# Altium PCB OmniCore_SDR.PcbDoc (part 7 of 14)
Units mil, origin at the board's own origin, x right, y up, seen from the top; angles counter-clockwise.
Board outline 4724.72 x 2755.91 mil, 8 copper layers (Top, GND 1, Layer 1, Layer 2, GND 2, Layer 3, Power, Bottom), stack 40.468 mil thick; 534 components, 427 nets, 2325 pads, 1892 vias.
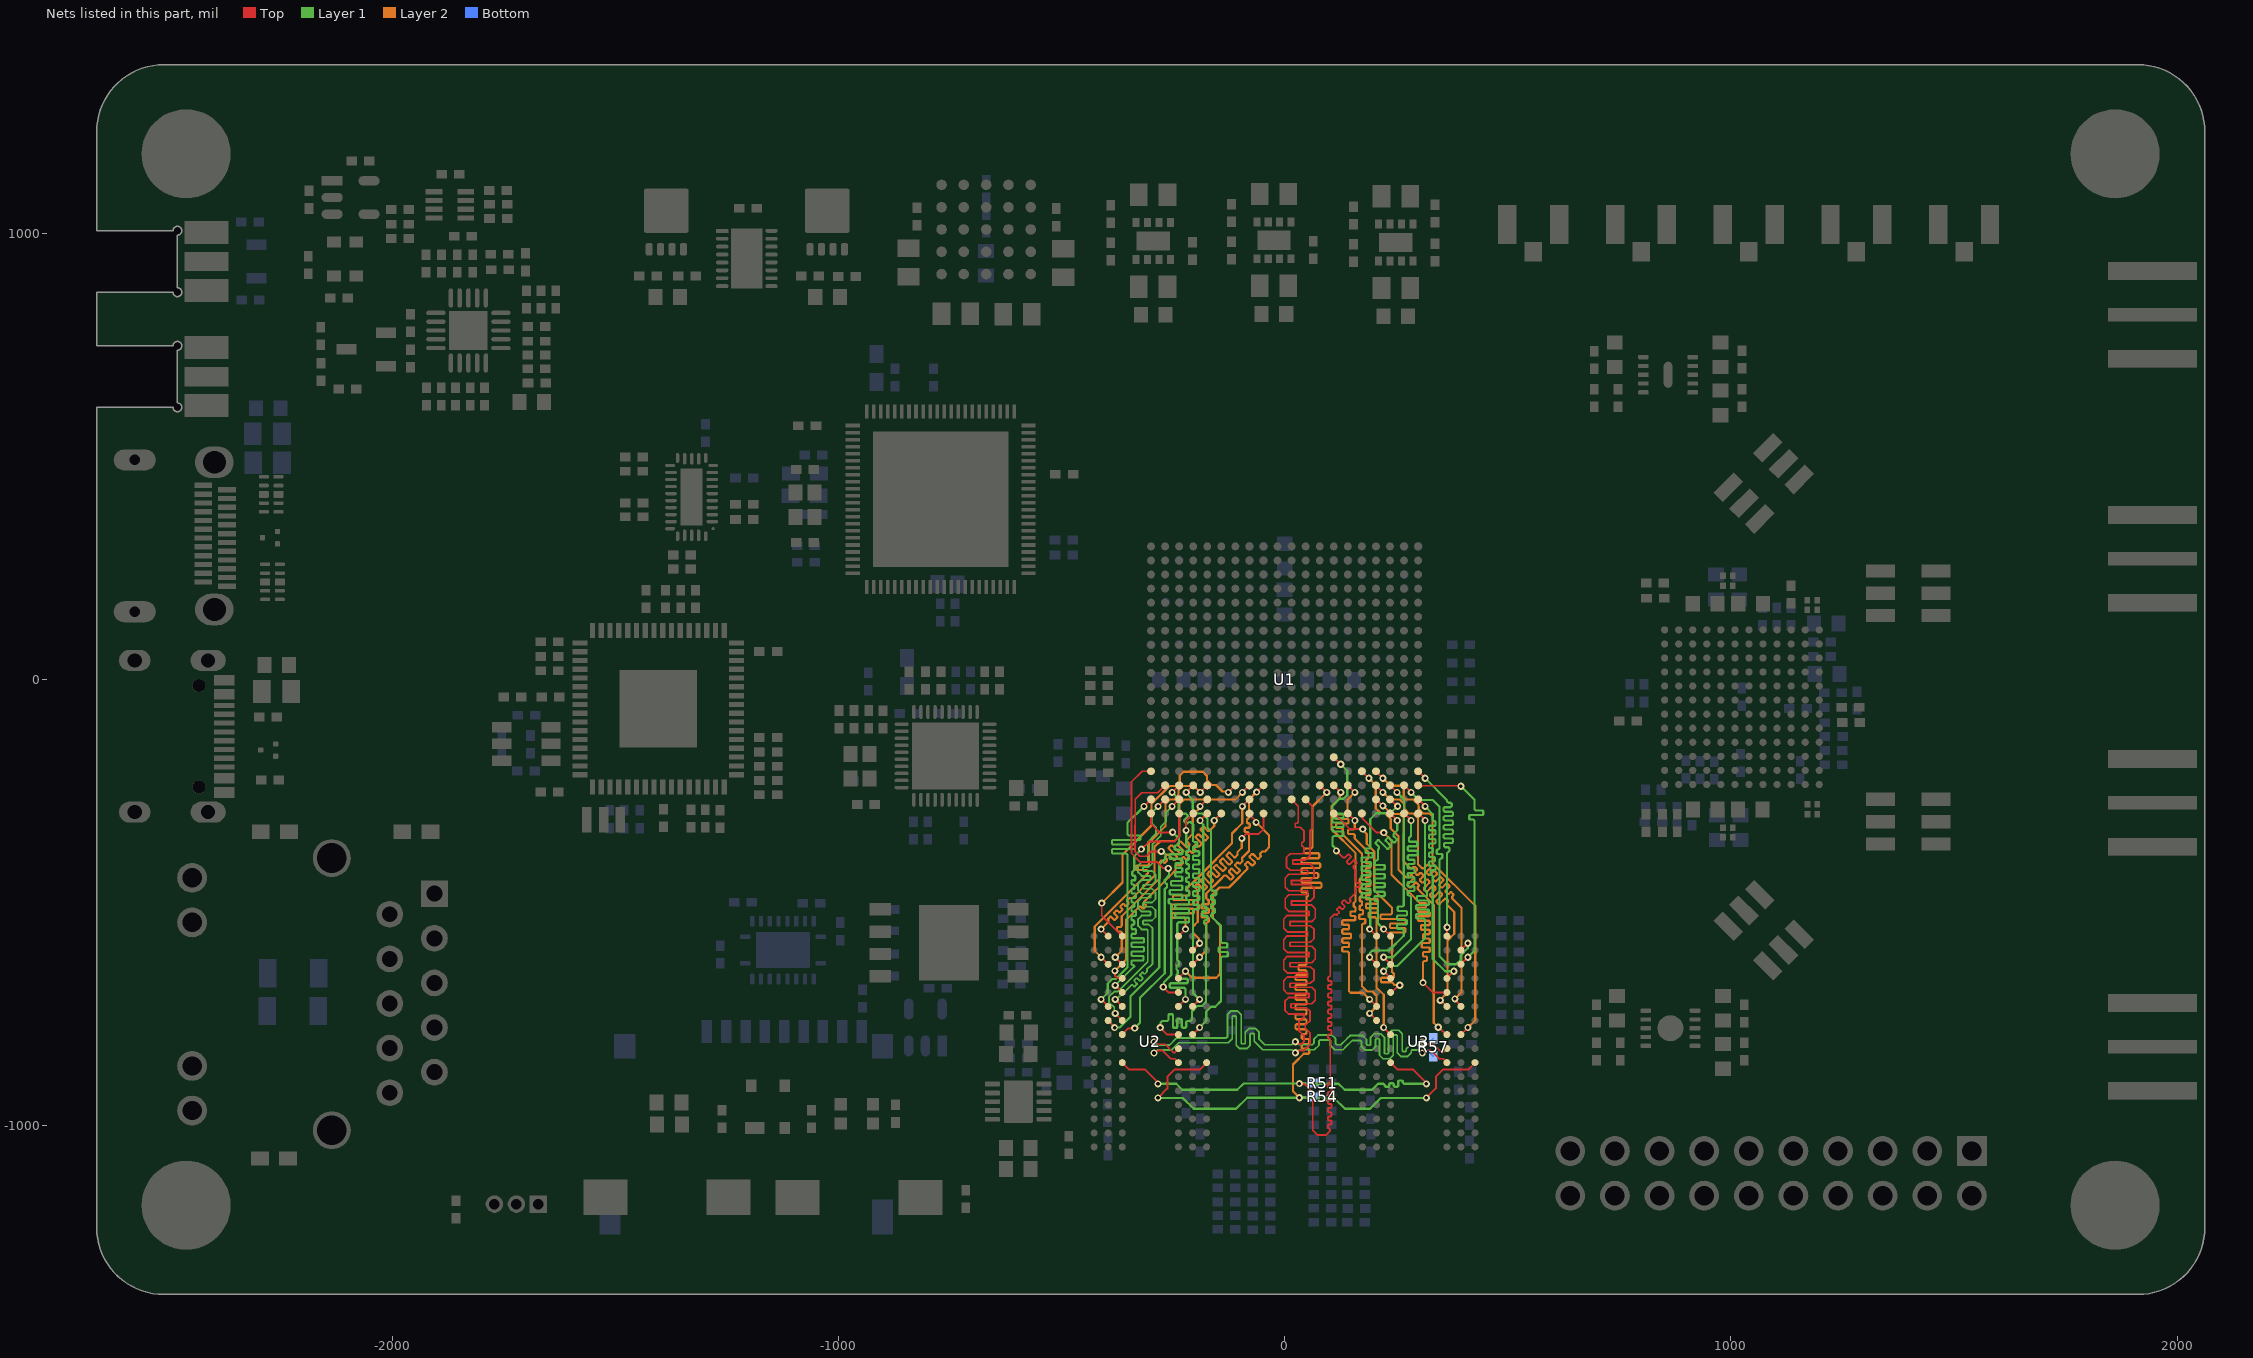
[diagram p12: the nets of this part, all layers, seen from the top]

## Via types
v1: diameter 16, hole 8, Top to Bottom, tented both sides, 1844 vias
v2: diameter 19.68, hole 7.87, Top to Bottom, 44 vias
v3: diameter 200, hole 125, Top to Bottom, 4 vias

## Nets (pads, with @x,y where several pads share a name; then routed paths per layer and width w, separated by ;. In a path a pad name is that pad's centre, name@x,y a point inside that pad or via, vN(x,y) a via of type N, cw(c..) or ccw(c..) an arc to the next point about the centre after c; other vN are vias at no path point) (continued)
DDR3_CAS: R51.2 U1.P5 U2.K3 U3.K3 | length 2378.9
  Top w4.2: U2.K3@-363.98,-858.46 -348.45,-874 -312.87,-874 -283.85,-903.02 v1(-283.85,-905.94) ; v1(33,-905.47) 33.67,-906.15 44.15,-906.15 63,-925 63,-1009.81 74.19,-1021 92,-1021 102,-1011 102,-1008.9 99.54,-1006.44 98.48,-1006.44 97.1,-1005.06 97.1,-998.62 98.48,-997.24 103.42,-997.24 104.8,-995.86 104.8,-989.42 103.42,-988.04 98.48,-988.04 97.1,-986.66 97.1,-980.22 98.48,-978.84 103.42,-978.84 104.8,-977.46 104.8,-971.02 103.42,-969.64 98.48,-969.64 97.1,-968.26 97.1,-961.82 98.48,-960.44 103.42,-960.44 104.8,-959.06 104.8,-952.62 103.42,-951.24 98.48,-951.24 97.1,-949.86 97.1,-943.42 98.48,-942.04 103.42,-942.04 104.8,-940.66 104.8,-934.22 103.42,-932.84 98.48,-932.84 97.1,-931.46 97.1,-925.02 98.48,-923.64 103.42,-923.64 104.8,-922.26 104.8,-915.82 103.42,-914.44 98.48,-914.44 97.1,-913.06 97.1,-906.62 98.48,-905.24 99.54,-905.24 102,-902.78 102,-806.5 99.54,-804.04 98.48,-804.04 97.1,-802.66 97.1,-796.22 98.48,-794.84 103.42,-794.84 104.8,-793.46 104.8,-787.02 103.42,-785.64 98.48,-785.64 97.1,-784.26 97.1,-777.82 98.48,-776.44 103.42,-776.44 104.8,-775.06 104.8,-768.62 103.42,-767.24 98.48,-767.24 97.1,-765.86 97.1,-759.42 98.48,-758.04 103.42,-758.04 104.8,-756.66 104.8,-750.22 103.42,-748.84 98.48,-748.84 97.1,-747.46 97.1,-741.02 98.48,-739.64 103.42,-739.64 104.8,-738.26 104.8,-731.82 103.42,-730.44 98.48,-730.44 97.1,-729.06 97.1,-722.62 98.48,-721.24 103.42,-721.24 104.8,-719.86 104.8,-713.42 103.42,-712.04 98.48,-712.04 97.1,-710.66 97.1,-704.22 98.48,-702.84 103.42,-702.84 104.8,-701.46 104.8,-695.02 103.42,-693.64 98.48,-693.64 97.1,-692.26 97.1,-685.82 98.48,-684.44 103.42,-684.44 104.8,-683.06 104.8,-676.62 103.42,-675.24 98.48,-675.24 97.1,-673.86 97.1,-667.42 98.48,-666.04 99.54,-666.04 102,-663.58 102,-556 102,-535 110.76,-526.24 114.24,-526.24 115.23,-527.22 117.18,-527.22 121.73,-522.67 121.73,-520.72 117.28,-516.27 117.28,-514.32 121.83,-509.76 123.79,-509.76 128.24,-514.21 130.19,-514.21 134.74,-509.66 134.74,-507.71 128.03,-501 128.03,-499.04 132.58,-494.49 134.54,-494.49 141.25,-501.2 143.2,-501.2 147.75,-496.65 147.75,-494.7 146.77,-493.71 146.77,-490.23 155,-482 159,-478 159,-467.22 161.46,-464.76 166.42,-464.76 167.8,-463.38 167.8,-456.94 166.42,-455.56 161.46,-455.56 159,-453.1 159,-438 159,-427 154.05,-422.05 154.05,-418.57 161.54,-411.08 161.54,-409.13 156.98,-404.58 155.03,-404.58 146.06,-413.55 144.1,-413.55 139.55,-409 139.55,-407.05 148.52,-398.07 148.52,-396.12 143.97,-391.57 142.02,-391.57 134.53,-399.05 131.05,-399.05 123.5,-391.5 v1(116,-384) ; U1.P5@109.99,-174.02 v1(125.74,-189.76) ; U3.K3@237.51,-858.46 253.05,-874 288.63,-874 317.64,-903.02 v1(317.64,-905.94)
  Layer 1 w5: v1(-283.85,-905.94) -243.06,-905.94 -229.57,-919.43 -106.43,-919.43 -92.47,-905.47 v1(33,-905.47) ; v1(33,-905.47) 120.51,-905.51 134.43,-919.43 195.57,-919.43 209.06,-905.94 221.56,-905.94 224.49,-908.86 224.49,-910.95 225.99,-912.45 232.99,-912.45 234.49,-910.95 234.49,-906.02 235.99,-904.52 242.99,-904.52 244.49,-906.02 244.49,-910.95 245.99,-912.45 252.99,-912.45 254.49,-910.95 254.49,-900.23 255.99,-898.73 262.99,-898.73 264.49,-900.23 264.49,-903.01 267.42,-905.94 292,-905.94 v1(317.64,-905.94) ; v1(116,-384) 116,-381.02 107,-372.02 107,-366 107,-353.5 109.93,-350.57 130.5,-350.57 132,-349.07 132,-342.07 130.5,-340.57 108.5,-340.57 107,-339.07 107,-332.07 108.5,-330.57 130.5,-330.57 132,-329.07 132,-322.07 130.5,-320.57 108.5,-320.57 107,-319.07 107,-312.07 108.5,-310.57 130.5,-310.57 132,-309.07 132,-302.07 130.5,-300.57 109.93,-300.57 107,-297.64 107,-282.49 121.49,-268 122.23,-267.26 131.75,-267.26 140.24,-258.76 140.24,-204.26 v1(125.74,-189.76)
  Bottom w4.2: v1(33,-905.47) 63.71,-905.47 R51.2@65,-904.18
DDR3_CKE: R54.2 U1.N3 U2.K9 U3.K9 | length 2451.5
  Top w4.2: v1(-283.85,-937.43) -262.69,-916.27 -262.69,-889.69 -247,-874 -190.55,-874 U2.K9@-175.01,-858.46 ; U1.N3@78.5,-237.01 v1(94.24,-252.76) ; v1(317.64,-937.43) 338.81,-916.27 338.81,-889.69 354.5,-874 410.95,-874 U3.K9@426.49,-858.46
  Layer 1 w5: v1(-283.85,-937.43) -228.57,-937.43 -204,-962 -109,-962 -83.97,-936.97 v1(33,-936.97) 51,-936.97 63.5,-936.97 66.43,-939.9 66.43,-941.99 67.93,-943.49 74.93,-943.49 76.43,-941.99 76.43,-935.92 77.93,-934.42 84.93,-934.42 86.43,-935.92 86.43,-941.99 87.93,-943.49 94.93,-943.49 96.43,-941.99 96.43,-932.3 97.93,-930.8 104.93,-930.8 106.43,-932.3 106.43,-934.04 109.36,-936.97 109.97,-936.97 135,-962 144,-962 191,-962 215.57,-937.43 v1(317.64,-937.43)
  Layer 2 w5: v1(33,-936.97) 18.5,-922.47 18.5,-862.5 22,-859 42.57,-838.43 52.8,-838.43 55,-836.23 55,-829.63 52.8,-827.43 40.55,-827.43 38.35,-825.23 38.35,-818.63 40.55,-816.43 52.8,-816.43 55,-814.23 55,-807.63 52.8,-805.43 40.45,-805.43 38.25,-803.23 38.25,-796.63 40.45,-794.43 46.8,-794.43 49,-792.23 49,-785.63 46.8,-783.43 26.2,-783.43 24,-781.23 24,-774.63 26.2,-772.43 46.8,-772.43 49,-770.23 49,-763.63 46.8,-761.43 26.2,-761.43 24,-759.23 24,-752.63 26.2,-750.43 46.8,-750.43 49,-748.23 49,-741.63 46.8,-739.43 26.2,-739.43 24,-737.23 24,-730.63 26.2,-728.43 46.8,-728.43 49,-726.23 49,-719.63 46.8,-717.43 26.2,-717.43 24,-715.23 24,-708.63 26.2,-706.43 46.8,-706.43 49,-704.23 49,-697.63 46.8,-695.43 26.2,-695.43 24,-693.23 24,-686.63 26.2,-684.43 46.8,-684.43 49,-682.23 49,-675.63 46.8,-673.43 26.2,-673.43 24,-671.23 24,-664.63 26.2,-662.43 46.8,-662.43 49,-660.23 49,-653.63 46.8,-651.43 32.9,-651.43 30.7,-649.23 30.7,-642.63 32.9,-640.43 46.07,-640.43 49,-637.5 49,-507 49,-487 51.5,-484.5 51.5,-480.36 48.57,-477.43 39.7,-477.43 37.5,-475.23 37.5,-468.63 39.7,-466.43 80.5,-466.43 82.7,-464.23 82.7,-457.63 80.5,-455.43 39.7,-455.43 37.5,-453.23 37.5,-446.63 39.7,-444.43 72.8,-444.43 75,-442.23 75,-435.63 72.8,-433.43 39.7,-433.43 37.5,-431.23 37.5,-424.63 39.7,-422.43 77.72,-422.43 79.92,-420.23 79.92,-413.63 77.72,-411.43 39.7,-411.43 37.5,-409.23 37.5,-402.63 39.7,-400.43 75.3,-400.43 77.5,-398.23 77.5,-391.63 75.3,-389.43 45.7,-389.43 43.5,-387.23 43.5,-380.63 45.7,-378.43 59.57,-378.43 62.5,-375.5 62.5,-364 62.5,-284.5 v1(94.24,-252.76)
  Bottom w4.2: v1(33,-936.97) 63.39,-936.97 R54.2@65,-935.36
DDR3_CLK0_N: R57.1 U1.M2 U2.K7 U3.K7 | length 2538.7
  Top w4: v1(-292.92,-836.88) -290.02,-836.88 -284.58,-831.44 -273.42,-831.44 -255.14,-849.71 -246.03,-849.71 -238,-857.74 U2.K7@-238,-858.46 ; v1(23.93,-836.42) 26.83,-836.42 32.28,-830.98 43.65,-830.98 57,-817.63 57,-803.86 57,-791.96 46.46,-781.42 45.92,-781.42 45.92,-772.42 48.8,-772.42 57,-764.22 57,-743.62 48.8,-735.42 14.48,-735.42 14.48,-726.42 60.34,-726.42 68.55,-718.22 68.55,-697.62 60.34,-689.42 12,-689.42 12,-680.42 57.62,-680.42 65.82,-672.22 65.82,-651.62 57.62,-643.42 12,-643.42 12,-634.42 60.34,-634.42 68.55,-626.22 68.55,-605.62 60.34,-597.42 12,-597.42 12,-588.42 57.62,-588.42 65.82,-580.22 65.82,-559.62 57.62,-551.42 12,-551.42 12,-542.42 60.34,-542.42 68.55,-534.22 68.55,-513.62 60.34,-505.42 15.2,-505.42 15.2,-496.42 57.62,-496.42 65.82,-488.22 65.82,-467.62 57.62,-459.42 15.2,-459.42 15.2,-450.42 57.55,-450.42 65.75,-442.22 65.75,-421.62 57.55,-413.42 17.93,-413.42 17.93,-404.42 46.46,-404.42 57,-393.88 57,-378.06 57,-338 62,-333 62,-283.5 U1.M2@47,-268.5 ; v1(308.58,-836.88) 311.48,-836.88 316.92,-831.44 328.08,-831.44 346.36,-849.71 355.47,-849.71 363.5,-857.74 U3.K7@363.5,-858.46
  Layer 1 w4: v1(-292.92,-836.88) -291.52,-836.88 -284.58,-829.94 -253.38,-829.94 -237.44,-814 -216,-814 -152.39,-814 -126.22,-814 -117.43,-805.21 -117.43,-755.35 -116.08,-754 -109.78,-754 -108.43,-755.35 -108.43,-819.08 -100.64,-826.87 -85.23,-826.87 -77.43,-819.08 -77.43,-794.58 -76.08,-793.23 -69.78,-793.23 -68.43,-794.58 -68.43,-810.57 -49.52,-829.48 -20,-829.48 15.59,-829.48 22.53,-836.42 v1(23.93,-836.42) 25.33,-836.42 32.28,-829.48 66.56,-829.48 77,-819.03 77,-809.79 79.34,-807.44 100.66,-807.44 103,-809.79 103,-820.66 111.79,-829.44 130.67,-829.44 137.11,-823 137.11,-822.94 151.22,-808.83 151.22,-808.78 159,-808.78 170.1,-808.78 172.44,-811.12 172.44,-822.57 180.24,-830.36 195.65,-830.36 203.44,-822.57 203.44,-806.07 204.79,-804.72 211.09,-804.72 212.44,-806.07 212.44,-841.94 220.24,-849.73 235.65,-849.73 243.44,-841.94 243.44,-797.97 244.79,-796.62 251.09,-796.62 252.44,-797.97 252.44,-836.67 260.24,-844.46 275.65,-844.46 283.44,-836.67 283.44,-832.28 285.79,-829.94 298.88,-829.94 300.23,-829.94 307.17,-836.88 v1(308.58,-836.88)
  Bottom w4: v1(308.58,-836.88) 311.48,-836.88 316.92,-831.44 322.81,-831.44 325.16,-833.78 325.16,-835.84 R57.1@333,-843.68
DDR3_CLK0_P: R57.2 U1.L2 U2.J7 U3.J7 | length 2538.7
  Top w4: v1(-293,-812) -290.1,-812 -284.66,-817.44 -267.62,-817.44 -249.34,-835.71 -246.03,-835.71 -238,-827.68 U2.J7@-238,-826.97 ; U1.L2@15.5,-268.5 30.57,-283.57 30.57,-290.49 30.57,-319.49 28.22,-321.83 24.95,-321.83 23.6,-323.18 23.6,-329.48 24.95,-330.83 35.03,-330.83 43,-338.8 43,-342 43,-362.38 40.66,-364.72 39.54,-364.72 38.19,-366.07 38.19,-372.37 39.54,-373.72 40.66,-373.72 43,-376.06 43,-378.06 43,-388.08 40.66,-390.42 12.13,-390.42 3.93,-398.62 3.93,-419.22 12.13,-427.42 51.75,-427.42 51.75,-436.42 9.4,-436.42 1.2,-444.62 1.2,-465.22 9.4,-473.42 51.82,-473.42 51.82,-482.42 9.4,-482.42 1.2,-490.62 1.2,-511.22 9.4,-519.42 54.55,-519.42 54.55,-528.42 6.2,-528.42 -2,-536.62 -2,-557.22 6.2,-565.42 51.82,-565.42 51.82,-574.42 6.2,-574.42 -2,-582.62 -2,-603.22 6.2,-611.42 54.55,-611.42 54.55,-620.42 6.2,-620.42 -2,-628.62 -2,-649.22 6.2,-657.42 51.82,-657.42 51.82,-666.42 6.2,-666.42 -2,-674.62 -2,-695.22 6.2,-703.42 54.55,-703.42 54.55,-712.42 8.68,-712.42 0.48,-720.62 0.48,-741.22 8.68,-749.42 43,-749.42 43,-758.42 40.12,-758.42 31.92,-766.62 31.92,-787.22 40.12,-795.42 40.66,-795.42 43,-797.76 43,-803.86 43,-811.83 37.85,-816.98 32.2,-816.98 26.76,-811.54 v1(23.85,-811.54) ; v1(308.5,-812) 311.4,-812 316.84,-817.44 333.88,-817.44 352.15,-835.71 355.47,-835.71 363.5,-827.68 U3.J7@363.5,-826.97
  Layer 1 w4: v1(-293,-812) -291.6,-812 -284.66,-818.94 -257.94,-818.94 -242,-803 -216,-803 -147.83,-803 -130.78,-803 -128.43,-800.66 -128.43,-750.79 -120.64,-743 -105.23,-743 -97.43,-750.79 -97.43,-814.52 -96.08,-815.87 -89.78,-815.87 -88.43,-814.52 -88.43,-790.02 -80.64,-782.23 -65.23,-782.23 -57.43,-790.02 -57.43,-806.01 -44.97,-818.48 -20,-818.48 15.51,-818.48 22.45,-811.54 v1(23.85,-811.54) 25.26,-811.54 32.2,-818.48 62,-818.48 66,-814.48 66,-805.23 74.79,-796.44 105.21,-796.44 114,-805.23 114,-816.1 116.34,-818.44 126.11,-818.44 126.11,-818.39 140.22,-804.28 140.22,-804.22 146.67,-797.78 159,-797.78 174.66,-797.78 183.44,-806.56 183.44,-818.01 184.79,-819.36 191.09,-819.36 192.44,-818.01 192.44,-801.52 200.24,-793.72 215.65,-793.72 223.44,-801.52 223.44,-837.38 224.79,-838.73 231.09,-838.73 232.44,-837.38 232.44,-793.42 240.24,-785.62 255.65,-785.62 263.44,-793.42 263.44,-832.11 264.79,-833.46 271.09,-833.46 272.44,-832.11 272.44,-827.73 281.23,-818.94 298.88,-818.94 300.15,-818.94 307.1,-812 v1(308.5,-812)
  Bottom w4: v1(308.5,-812) 311.4,-812 316.84,-817.44 322.81,-817.44 325.16,-815.1 325.16,-812.16 R57.2@333,-804.31
DDR3_D0: U1.C3 U2.F8 | length 741.2
  Top w4.2: v1(-252.21,-252.76) U1.C3@-236.46,-237.01 ; U2.F8@-206.5,-732.48 v1(-190.76,-716.73)
  Layer 1 w5: v1(-252.21,-252.76) -237.71,-267.26 -237.71,-292.16 -230.94,-298.94 -229.17,-300.7 -225.03,-300.7 -224.13,-299.81 -222.01,-299.81 -217.06,-304.76 -217.06,-306.88 -225.55,-315.37 -225.55,-317.49 -220.6,-322.44 -218.48,-322.44 -215.03,-318.99 -210.88,-318.99 -205,-324.87 -205,-338 -205,-339 -205.26,-339.26 -205.26,-351.45 -205.26,-361.64 -202.33,-364.57 -197.21,-364.57 -195.71,-366.07 -195.71,-373.07 -197.21,-374.57 -203.76,-374.57 -205.26,-376.07 -205.26,-383.07 -203.76,-384.57 -192.85,-384.57 -191.35,-386.07 -191.35,-393.07 -192.85,-394.57 -203.76,-394.57 -205.26,-396.07 -205.26,-403.07 -203.76,-404.57 -192.85,-404.57 -191.35,-406.07 -191.35,-413.07 -192.85,-414.57 -203.76,-414.57 -205.26,-416.07 -205.26,-423.07 -203.76,-424.57 -192.85,-424.57 -191.35,-426.07 -191.35,-433.07 -192.85,-434.57 -203.76,-434.57 -205.26,-436.07 -205.26,-443.07 -203.76,-444.57 -192.85,-444.57 -191.35,-446.07 -191.35,-453.07 -192.85,-454.57 -203.76,-454.57 -205.26,-456.07 -205.26,-463.07 -203.76,-464.57 -192.85,-464.57 -191.35,-466.07 -191.35,-473.07 -192.85,-474.57 -203.76,-474.57 -205.26,-476.07 -205.26,-483.07 -203.76,-484.57 -192.85,-484.57 -191.35,-486.07 -191.35,-493.07 -192.85,-494.57 -203.76,-494.57 -205.26,-496.07 -205.26,-503.07 -203.76,-504.57 -192.85,-504.57 -191.35,-506.07 -191.35,-513.07 -192.85,-514.57 -202.33,-514.57 -205.26,-517.5 -205.26,-530 -205.26,-702.23 v1(-190.76,-716.73)
DDR3_D1: U1.B3 U2.G2 | length 741.1
  Top w4.2: U2.G2@-395.48,-763.97 -395.48,-764.75 -381,-779.23 v1(-381,-780) ; v1(-276.5,-385) -299,-385 -310,-396 -324.94,-396 -335.1,-385.84 -335.1,-327.07 -334.8,-326.77 -334.8,-268 -320.35,-253.55 -284.5,-253.55 U1.B3@-267.96,-237.01
  Layer 1 w5: v1(-381,-780) -380.54,-779.54 -369.54,-779.54 -345.5,-755.5 -345.5,-709.5 -281,-645 -281,-415 -267,-401 -267,-392 -274,-385 v1(-276.5,-385)
DDR3_D2: U1.A2 U2.F2 | length 740.9
  Top w4.2: v1(-411.23,-716.73) U2.F2@-395.48,-732.48 ; v1(-315.2,-284.25) U1.A2@-299.46,-268.5
  Layer 1 w5: v1(-411.23,-716.73) -411.23,-716.41 -396.73,-701.91 -396.73,-681.72 -385.74,-670.73 -377.96,-670.73 -352,-644.77 -352,-395 -352,-392.5 -354.93,-389.57 -385.5,-389.57 -387,-388.07 -387,-381.07 -385.5,-379.57 -337,-379.57 -335.5,-378.07 -335.5,-371.07 -337,-369.57 -385.5,-369.57 -387,-368.07 -387,-361.07 -385.5,-359.57 -325,-359.57 -323.5,-358.07 -323.5,-351.07 -325,-349.57 -349.07,-349.57 -352,-346.64 -352,-332 -352,-321.05 v1(-315.2,-284.25)
DDR3_D3: U1.A4 U2.H3 | length 739.6
  Top w4.2: U2.H3@-363.98,-795.47 -350.3,-781.79 -336.79,-781.79 v1(-336,-781) ; U1.A4@-299.46,-205.51 -319.36,-205.51 -343.3,-229.46 -343.3,-389.24 -323.54,-409 -285.45,-409 -271.71,-422.74 -261.26,-422.74 v1(-260.78,-423.22)
  Layer 1 w5: v1(-336,-781) -324,-769 -324,-713 -269,-658 -269,-482.25 -269,-469.75 -266.07,-466.82 -265.36,-466.82 -263.86,-465.32 -263.86,-458.32 -265.36,-456.82 -266.07,-456.82 -269,-453.89 -269,-449 -259,-439 -259,-425 v1(-260.78,-423.22)
DDR3_D4: U1.D3 U2.H8 | length 740.9
  Top w4.2: v1(-220.5,-252.76) -220.5,-252.65 -204.97,-237.12 U1.D3@-204.97,-237.01 ; U2.H8@-206.5,-795.47 v1(-190.76,-779.72)
  Layer 1 w5: v1(-220.5,-252.76) -220.5,-254.71 -206,-269.21 -206,-290 -196.13,-299.87 -184.87,-299.87 -173,-311.74 -173,-332 -165,-340 -165,-453 -165,-470.35 -162.07,-473.28 -155.1,-473.28 -153.6,-474.78 -153.6,-481.78 -155.1,-483.28 -163.5,-483.28 -165,-484.78 -165,-491.78 -163.5,-493.28 -158,-493.28 -156.5,-494.78 -156.5,-501.78 -158,-503.28 -163.5,-503.28 -165,-504.78 -165,-511.78 -163.5,-513.28 -158,-513.28 -156.5,-514.78 -156.5,-521.78 -158,-523.28 -161.72,-523.28 -164.65,-526.21 -164.65,-530.35 -159.22,-535.78 -142.58,-552.42 -142.58,-569 -142.58,-587.64 -139.65,-590.57 -130.22,-590.57 -128.72,-592.07 -128.72,-599.07 -130.22,-600.57 -147.08,-600.57 -148.58,-602.07 -148.58,-609.07 -147.08,-610.57 -129.08,-610.57 -127.58,-612.07 -127.58,-619.07 -129.08,-620.57 -139.65,-620.57 -142.58,-623.5 -142.58,-636 -142.58,-720.32 -155.66,-733.39 -165.17,-733.39 -175.83,-744.05 -175.83,-764.8 v1(-190.76,-779.72)
DDR3_D5: U1.D1 U2.F7 | length 746.2
  Top w4.2: U2.F7@-238,-732.48 v1(-222.25,-716.73) ; v1(-221,-338) -221,-316.03 U1.D1@-204.97,-300
  Layer 1 w5: v1(-222.25,-716.73) -222.25,-696 -222.25,-693.5 -225.18,-690.57 -256,-690.57 -257.5,-689.07 -257.5,-682.07 -256,-680.57 -218.92,-680.57 -217.42,-679.07 -217.42,-672.07 -218.92,-670.57 -241,-670.57 -242.5,-669.07 -242.5,-662.07 -241,-660.57 -239.5,-659.07 -239.5,-652.07 -241,-650.57 -242.5,-649.07 -242.5,-642.07 -241,-640.57 -238.07,-640.57 -236.57,-639.07 -236.57,-632.07 -238.07,-630.57 -241,-627.64 -241,-581 -241,-559.25 -241,-546.75 -238.07,-543.82 -215.76,-543.82 -214.26,-542.32 -214.26,-535.32 -215.76,-533.82 -243.5,-533.82 -245,-532.32 -245,-525.32 -243.5,-523.82 -215.76,-523.82 -214.26,-522.32 -214.26,-515.32 -215.76,-513.82 -243.5,-513.82 -245,-512.32 -245,-505.32 -243.5,-503.82 -215.76,-503.82 -214.26,-502.32 -214.26,-495.32 -215.76,-493.82 -219,-493.82 -220.5,-492.32 -220.5,-485.32 -219,-483.82 -215.76,-483.82 -214.26,-482.32 -214.26,-475.32 -215.76,-473.82 -219,-473.82 -220.5,-472.32 -220.5,-465.32 -219,-463.82 -215.76,-463.82 -214.26,-462.32 -214.26,-455.32 -215.76,-453.82 -219,-453.82 -220.5,-452.32 -220.5,-445.32 -219,-443.82 -215.76,-443.82 -214.26,-442.32 -214.26,-435.32 -215.76,-433.82 -219,-433.82 -220.5,-432.32 -220.5,-425.32 -219,-423.82 -215.76,-423.82 -214.26,-422.32 -214.26,-415.32 -215.76,-413.82 -219,-413.82 -220.5,-412.32 -220.5,-405.32 -219,-403.82 -215.76,-403.82 -214.26,-402.32 -214.26,-395.32 -215.76,-393.82 -219,-393.82 -220.5,-392.32 -220.5,-385.32 -219,-383.82 -215.76,-383.82 -214.26,-382.32 -214.26,-375.32 -215.76,-373.82 -217.57,-373.82 -220.5,-370.89 -220.5,-365 -220.5,-338.5 v1(-221,-338)
DDR3_D6: U1.C1 U2.E3 | length 743.4
  Top w4.2: v1(-379.73,-685.23) U2.E3@-363.98,-700.98 ; v1(-321,-380) -304,-363 -247,-363 -236.46,-352.46 U1.C1@-236.46,-300
  Layer 1 w5: v1(-379.73,-685.23) -339.42,-644.92 -337,-642.5 -337,-642.42 -339.93,-639.49 -341.5,-639.49 -343,-637.99 -343,-630.99 -341.5,-629.49 -317.71,-629.49 -316.21,-627.99 -316.21,-620.99 -317.71,-619.49 -341.5,-619.49 -343,-617.99 -343,-610.99 -341.5,-609.49 -317,-609.49 -315.5,-607.99 -315.5,-600.99 -317,-599.49 -341.5,-599.49 -343,-597.99 -343,-590.99 -341.5,-589.49 -317,-589.49 -315.5,-587.99 -315.5,-580.99 -317,-579.49 -341.5,-579.49 -343,-577.99 -343,-570.99 -341.5,-569.49 -334.59,-569.49 -333.09,-567.99 -333.09,-560.99 -334.59,-559.49 -341.5,-559.49 -343,-557.99 -343,-550.99 -341.5,-549.49 -338.5,-549.49 -337,-547.99 -337,-540.99 -338.5,-539.49 -341.5,-539.49 -343,-537.99 -343,-530.99 -341.5,-529.49 -334.86,-529.49 -333.36,-527.99 -333.36,-520.99 -334.86,-519.49 -341.5,-519.49 -343,-517.99 -343,-510.99 -341.5,-509.49 -338.5,-509.49 -337,-507.99 -337,-500.99 -338.5,-499.49 -341.5,-499.49 -343,-497.99 -343,-490.99 -341.5,-489.49 -334.86,-489.49 -333.36,-487.99 -333.36,-480.99 -334.86,-479.49 -341.5,-479.49 -343,-477.99 -343,-470.99 -341.5,-469.49 -338.5,-469.49 -337,-467.99 -337,-460.99 -338.5,-459.49 -341.5,-459.49 -343,-457.99 -343,-450.99 -341.5,-449.49 -336.14,-449.49 -334.64,-447.99 -334.64,-440.99 -336.14,-439.49 -339.93,-439.49 -341.43,-437.99 -341.43,-430.99 -339.93,-429.49 -337,-426.56 -337,-407 -337,-396 v1(-321,-380)
DDR3_D7: U1.E1 U2.H7 | length 741.3
  Top w4.2: v1(-279,-780) -263.53,-795.47 U2.H7@-238,-795.47 ; v1(-189.5,-315.75) -189.36,-315.75 -173.61,-300 U1.E1@-173.47,-300
  Layer 1 w5: v1(-279,-780) -278.04,-779.04 -278.04,-769.04 -274.22,-765.22 -266,-765.22 -263.5,-765.22 -260.57,-762.29 -260.57,-751.72 -259.07,-750.22 -252.07,-750.22 -250.57,-751.72 -250.57,-778.72 -249.07,-780.22 -242.07,-780.22 -240.57,-778.72 -240.57,-761.91 -239.07,-760.41 -232.07,-760.41 -230.57,-761.91 -230.57,-778.72 -229.07,-780.22 -222.07,-780.22 -220.57,-778.72 -220.57,-768.15 -217.64,-765.22 -210.68,-765.22 -207.75,-762.29 -207.75,-743.75 -195.23,-731.23 -184.75,-731.23 -176.26,-722.74 -176.26,-551.49 -176.26,-550.74 -180.93,-546.07 -180.93,-541.92 -178.01,-538.99 -175.15,-538.99 -173.65,-537.49 -173.65,-530.49 -175.15,-528.99 -183.07,-528.99 -184.57,-527.49 -184.57,-520.49 -183.07,-518.99 -176.16,-518.99 -174.66,-517.49 -174.66,-510.49 -176.16,-508.99 -179.42,-508.99 -182.35,-506.07 -182.35,-353 -182.35,-324.65 -189.5,-317.5 v1(-189.5,-315.75)
DDR3_D8: U1.E2 U2.C3 | length 619
  Top w4.2: v1(-379.73,-622.24) U2.C3@-363.98,-637.99 ; v1(-189.5,-284.25) -189.36,-284.25 -173.61,-268.5 U1.E2@-173.47,-268.5
  Layer 2 w5: v1(-379.73,-622.24) -365.23,-607.74 -365.23,-569.75 -365.23,-567.25 -368.16,-564.32 -374.03,-564.32 -375.53,-562.82 -375.53,-555.82 -374.03,-554.32 -368.16,-554.32 -365.23,-551.39 -365.23,-540 -365.23,-530.23 -280,-445 -280,-422.66 -280,-420 -279.56,-419.56 -279.56,-415.42 -281.94,-413.04 -281.94,-410.92 -276.99,-405.97 -274.87,-405.97 -270.51,-410.33 -268.39,-410.33 -263.44,-405.38 -263.44,-403.26 -267.79,-398.91 -267.79,-396.79 -262.84,-391.84 -260.71,-391.84 -248.46,-404.1 -246.34,-404.1 -241.39,-399.15 -241.39,-397.02 -259.78,-378.63 -259.78,-376.51 -254.83,-371.56 -252.71,-371.56 -234.32,-389.95 -232.2,-389.95 -227.25,-385 -227.25,-382.88 -240.14,-369.99 -240.14,-367.87 -235.19,-362.92 -233.07,-362.92 -220.18,-375.81 -218.05,-375.81 -213.1,-370.86 -213.1,-368.74 -218.85,-362.99 -218.85,-358.85 -212.5,-352.5 -206,-346 -206,-302.99 -189.5,-286.49 v1(-189.5,-284.25)
DDR3_D9: U1.E3 U2.C2 | length 618.3
  Top w4.2: v1(-411.23,-622.24) U2.C2@-395.48,-637.99 ; v1(-189.22,-252.76) U1.E3@-173.47,-237.01
  Layer 2 w5: v1(-411.23,-622.24) -425.73,-607.74 -425.73,-553.24 -381.56,-509.08 -317.24,-444.76 -308.93,-436.44 -306.43,-433.94 -306.43,-429.8 -309.36,-426.87 -332.5,-426.87 -334,-425.37 -334,-418.37 -332.5,-416.87 -306.93,-416.87 -304,-413.94 -304,-386 -304,-365.12 -267.36,-328.48 -267.36,-278.89 -257.47,-269 -247.95,-269 -237.71,-258.76 -237.71,-247.71 -228.26,-238.26 -203.72,-238.26 v1(-189.22,-252.76)
DDR3_D10: U1.G3 U2.A3 | length 618.8
  Top w4.2: v1(-410,-501) -410,-528.98 U2.A3@-363.98,-575 ; v1(-126.23,-252.76) U1.G3@-110.48,-237.01
  Layer 2 w5: v1(-410,-501) -363.5,-454.5 -363.5,-392.5 -298.21,-327.21 -298.21,-278.25 -258.22,-238.26 -244.26,-238.26 -235.22,-229.22 -235.22,-215.25 -226.72,-206.76 -183.21,-206.76 -174,-215.97 -174,-225.49 -163.49,-236 -153.97,-236 -139.32,-250.65 -128.33,-250.65 v1(-126.23,-252.76)
DDR3_D11: U1.H3 U2.A2 | length 619
  Top w4.2: v1(-411.23,-559.25) U2.A2@-395.48,-575 ; v1(-94.73,-252.76) U1.H3@-78.98,-237.01
  Layer 2 w5: v1(-411.23,-559.25) -397.13,-545.15 -395.36,-543.38 -395.36,-539.24 -396.12,-538.48 -396.12,-536.36 -391.17,-531.41 -389.05,-531.41 -382.36,-538.09 -380.24,-538.09 -375.29,-533.14 -375.29,-531.02 -381.98,-524.34 -381.98,-522.22 -377.03,-517.27 -374.9,-517.27 -371.01,-521.16 -368.89,-521.16 -363.94,-516.21 -363.94,-514.09 -367.83,-510.2 -367.83,-508.08 -362.88,-503.13 -360.76,-503.13 -357.27,-506.62 -355.14,-506.62 -350.19,-501.67 -350.19,-499.55 -352.93,-496.81 -352.93,-494.69 -347.98,-489.74 -345.86,-489.74 -341.72,-489.74 -300.49,-448.51 -292,-440.02 -292,-375 -278.5,-361.5 -246.5,-361.5 -236,-351 -236,-279.25 -225.75,-269 -110.98,-269 v1(-94.73,-252.76)
DDR3_D12: U1.J3 U2.C8 | length 616.9
  Top w4.2: U2.C8@-206.5,-637.99 v1(-190.76,-622.24) ; v1(-62.84,-252.15) -62.74,-252.15 -47.6,-237.01 U1.J3@-47.49,-237.01
  Layer 2 w5: v1(-190.76,-622.24) -176.66,-608.14 ; -175.58,-605.01 -175.58,-558.7 -175.58,-546.2 -172.65,-543.27 -171.5,-543.27 -170,-541.77 -170,-534.77 -171.5,-533.27 -184.5,-533.27 -186,-531.77 -186,-524.77 -184.5,-523.27 -171.5,-523.27 -170,-521.77 -170,-514.77 -171.5,-513.27 -184.5,-513.27 -186,-511.77 -186,-504.77 -184.5,-503.27 -171.5,-503.27 -170,-501.77 -170,-494.77 -171.5,-493.27 -172.65,-493.27 -175.58,-490.34 -175.58,-479.58 -144,-448 -135.16,-439.16 -131.02,-439.16 -122.01,-448.17 -119.89,-448.17 -114.94,-443.22 -114.94,-441.09 -124.96,-431.08 -124.96,-428.96 -120.01,-424.01 -117.89,-424.01 -107.87,-434.02 -105.75,-434.02 -100.8,-429.07 -100.8,-426.95 -110.82,-416.94 -110.82,-414.82 -105.87,-409.87 -103.74,-409.87 -101.74,-411.87 -99.62,-411.87 -94.67,-406.92 -94.67,-404.8 -95.66,-403.81 -95.66,-399.66 -80,-384 -80,-359 -80,-347.57 -80,-345.07 -82.93,-342.14 -87.86,-342.14 -89.36,-340.64 -89.36,-333.64 -87.86,-332.14 -80,-332.14 -78.5,-330.64 -78.5,-323.64 -80,-322.14 -83.12,-322.14 -84.62,-320.64 -84.62,-313.64 -83.12,-312.14 -82.93,-312.14 -80,-309.21 -80,-299 -80,-269 -63.15,-252.15 v1(-62.84,-252.15)
DDR3_D13: U1.H2 U2.A7 | length 618.8
  Top w4.2: U2.A7@-238,-575 v1(-222.25,-559.25) ; v1(-94.75,-284.24) U1.H2@-78.98,-268.5
  Layer 2 w5: v1(-222.25,-559.25) -222.25,-536.75 -225.18,-533.82 -250.75,-533.82 -252.25,-532.32 -252.25,-525.32 -250.75,-523.82 -205.5,-523.82 -204,-522.32 -204,-515.32 -205.5,-513.82 -250.75,-513.82 -252.25,-512.32 -252.25,-505.32 -250.75,-503.82 -205.5,-503.82 -204,-502.32 -204,-495.32 -205.5,-493.82 -248.69,-493.82 -250.19,-492.32 -250.19,-485.32 -248.69,-483.82 -214.82,-483.82 -213.32,-482.32 -213.32,-475.32 -214.82,-473.82 -217.75,-470.89 -217.75,-466.75 -190,-439 -118,-367 -118,-344.75 -95.13,-321.88 -95.13,-284.63 v1(-94.75,-284.24)
DDR3_D14: U1.H1 U2.D7 | length 619.7
  Top w4.2: U2.D7@-238,-669.49 v1(-222.25,-653.74) ; U1.H1@-78.98,-300 -78.98,-302.51 -64,-317.49 v1(-64,-320)
  Layer 2 w5: v1(-222.25,-653.74) -207.75,-668.24 -153.24,-668.24 -144.76,-659.76 -144.76,-550.24 -161,-534 -161,-481.09 -145.91,-466 -125,-466 -113.75,-454.75 -83.7,-424.7 -83.7,-420.56 -88.57,-415.68 -88.57,-413.56 -83.62,-408.61 -81.5,-408.61 -73.48,-416.63 -71.36,-416.63 -66.41,-411.68 -66.41,-409.56 -78.08,-397.89 -78.08,-395.77 -73.13,-390.82 -71,-390.82 -60.41,-401.41 -58.29,-401.41 -53.34,-396.46 -53.34,-394.34 -55.41,-392.27 -55.41,-390.15 -50.46,-385.2 -48.34,-385.2 -44.2,-385.2 -41.31,-382.31 -35,-376 -35,-349 v1(-64,-320)
DDR3_D15: U1.J1 U2.B8 | length 619.2
  Top w4.2: U2.B8@-206.5,-606.49 v1(-190.76,-590.75) ; v1(-96,-356) -86,-346 -58,-346 -47.49,-335.49 U1.J1@-47.49,-300
  Layer 2 w5: v1(-190.76,-590.75) -192,-589.5 -192,-581 -205.26,-567.74 -205.26,-553.24 -195,-542.99 -195,-503.64 -195,-476 -194.98,-471.84 -201.49,-465.33 -201.49,-463.21 -196.54,-458.26 -194.41,-458.26 -181.76,-470.91 -179.64,-470.91 -174.69,-465.96 -174.69,-463.84 -187.34,-451.19 -187.34,-449.07 -182.39,-444.12 -180.27,-444.12 -167.62,-456.77 -165.5,-456.77 -160.55,-451.82 -160.55,-449.7 -173.2,-437.05 -173.2,-434.93 -168.25,-429.98 -166.13,-429.98 -153.48,-442.63 -151.36,-442.63 -146.41,-437.68 -146.41,-435.56 -159.06,-422.91 -159.06,-420.79 -154.11,-415.84 -151.99,-415.84 -139.34,-428.49 -137.22,-428.49 -132.27,-423.54 -132.27,-421.42 -144.92,-408.77 -144.92,-406.64 -139.97,-401.69 -137.85,-401.69 -125.2,-414.35 -123.07,-414.35 -118.12,-409.4 -118.12,-407.27 -130.05,-395.35 -130.05,-393.23 -125.1,-388.28 -122.98,-388.28 -113.06,-398.2 -110.94,-398.2 -105.99,-393.25 -105.99,-391.13 -105.99,-386.99 -96,-377 v1(-96,-356)
DDR3_D16: U1.P1 U3.E3 | length 728.2
  Top w4.2: U1.P1@109.99,-300 110.5,-300 145.25,-334.75 174.75,-334.75 v1(175,-335) ; U3.E3@237.51,-700.98 239.77,-700.98 255.75,-685 v1(258,-685)
  Layer 2 w5: v1(175,-335) 175,-337.22 184,-346.22 184,-368.05 200.97,-385.03 200.97,-471.97 240.5,-511.5 240.5,-520 240.5,-523.64 237.57,-526.57 216.5,-526.57 215,-528.07 215,-535.07 216.5,-536.57 269,-536.57 270.5,-538.07 270.5,-545.07 269,-546.57 237.77,-546.57 236.27,-548.07 236.27,-555.07 237.77,-556.57 269,-556.57 270.5,-558.07 270.5,-565.07 269,-566.57 236.45,-566.57 234.95,-568.07 234.95,-575.07 236.45,-576.57 237.57,-576.57 240.5,-579.5 240.5,-582 240.5,-609 240.5,-655.43 243.43,-658.36 244.93,-659.86 244.93,-666.86 243.43,-668.36 217.56,-668.36 216.06,-669.86 216.06,-676.86 217.56,-678.36 240.36,-678.36 245.78,-683.78 246.54,-684.54 257.54,-684.54 v1(258,-685)
DDR3_D17: U1.P3 U3.F2 | length 727.6
  Top w4.2: U1.P3@109.99,-237.01 v1(125.74,-252.76) ; v1(190.27,-716.73) U3.F2@206.02,-732.48
  Layer 2 w5: v1(125.74,-252.76) 123.64,-254.86 123.64,-265.85 105,-284.49 105,-335 159,-389 159,-401 159,-496.64 156.07,-499.57 154.57,-501.07 154.57,-508.07 156.07,-509.57 157.5,-509.57 159,-511.07 159,-518.07 157.5,-519.57 149.13,-519.57 147.63,-521.07 147.63,-528.07 149.13,-529.57 156.76,-529.57 158.26,-531.07 158.26,-538.07 156.76,-539.57 130.5,-539.57 129,-541.07 129,-548.07 130.5,-549.57 142.77,-549.57 144.27,-551.07 144.27,-558.07 142.77,-559.57 130.5,-559.57 129,-561.07 129,-568.07 130.5,-569.57 147.09,-569.57 148.59,-571.07 148.59,-578.07 147.09,-579.57 130.5,-579.57 129,-581.07 129,-588.07 130.5,-589.57 142.77,-589.57 144.27,-591.07 144.27,-598.07 142.77,-599.57 130.5,-599.57 129,-601.07 129,-608.07 130.5,-609.57 141.34,-609.57 144.27,-612.5 144.27,-615 144.27,-698.27 148,-702 175.54,-702 v1(190.27,-716.73)
DDR3_D18: U1.R3 U3.G2 | length 729.7
  Top w4.2: U1.R3@141.49,-237.01 v1(157.24,-252.76) ; v1(190.27,-748.23) U3.G2@206.02,-763.97
  Layer 2 w5: v1(157.24,-252.76) 141,-268.99 141,-294 132.49,-302.51 115.5,-302.51 114,-304.01 114,-311.01 115.5,-312.51 141.24,-312.51 142.74,-314.01 142.74,-321.01 141.24,-322.51 116.74,-322.51 115.24,-324.01 115.24,-331.01 116.74,-332.51 127.07,-332.51 130,-335.44 130,-337.94 130,-347 173.27,-390.27 173.27,-399 173.27,-443.64 170.34,-446.57 169.5,-446.57 168,-448.07 168,-455.07 169.5,-456.57 171.77,-456.57 173.27,-458.07 173.27,-465.07 171.77,-466.57 169.5,-466.57 168,-468.07 168,-475.07 169.5,-476.57 171.77,-476.57 173.27,-478.07 173.27,-485.07 171.77,-486.57 169.5,-486.57 168,-488.07 168,-495.07 169.5,-496.57 171.77,-496.57 173.27,-498.07 173.27,-505.07 171.77,-506.57 169.5,-506.57 168,-508.07 168,-515.07 169.5,-516.57 173.76,-516.57 175.26,-518.07 175.26,-525.07 173.76,-526.57 168.76,-526.57 167.26,-528.07 167.26,-535.07 168.76,-536.57 179.21,-536.57 180.71,-538.07 180.71,-545.07 179.21,-546.57 176.2,-546.57 173.27,-549.5 173.27,-602 173.27,-687.01 185.13,-698.86 196.86,-698.86 206,-708 206,-732.5 v1(190.27,-748.23)
DDR3_D19: U1.R1 U3.H3 | length 727.5
  Top w4.2: U1.R1@141.49,-300 v1(157.24,-315.75) ; v1(221.77,-779.72) U3.H3@237.51,-795.47
  Layer 2 w5: v1(157.24,-315.75) 157.24,-327 157.24,-333.21 154.31,-336.14 143.36,-336.14 141.86,-337.64 141.86,-344.64 143.36,-346.14 154.31,-346.14 157.24,-349.07 157.24,-356.24 169.64,-368.64 188,-387 188,-399.5 185.07,-402.43 183.77,-402.43 182.27,-403.93 182.27,-410.93 183.77,-412.43 190.47,-412.43 191.97,-413.93 191.97,-420.93 190.47,-422.43 183.77,-422.43 182.27,-423.93 182.27,-430.93 183.77,-432.43 190.47,-432.43 191.97,-433.93 191.97,-440.93 190.47,-442.43 183.77,-442.43 182.27,-443.93 182.27,-450.93 183.77,-452.43 190.47,-452.43 191.97,-453.93 191.97,-460.93 190.47,-462.43 183.77,-462.43 182.27,-463.93 182.27,-470.93 183.77,-472.43 190.49,-472.43 191.99,-473.93 191.99,-480.93 190.49,-482.43 183.77,-482.43 182.27,-483.93 182.27,-490.93 183.77,-492.43 207.2,-492.43 208.7,-493.93 208.7,-500.93 207.2,-502.43 183.77,-502.43 182.27,-503.93 182.27,-510.93 183.77,-512.43 206.49,-512.43 207.99,-513.93 207.99,-520.93 206.49,-522.43 189.22,-522.43 187.72,-523.93 187.72,-530.93 189.22,-532.43 203.07,-532.43 206,-535.36 206,-546.68 206,-690.49 221.77,-706.26 v1(221.77,-779.72)
DDR3_D20: U1.T4 U3.H7 | length 727.7
  Top w4.2: U1.T4@172.98,-205.51 v1(188.73,-221.26) ; v1(344,-779) 345.51,-779 361.98,-795.47 U3.H7@363.5,-795.47
  Layer 2 w5: v1(188.73,-221.26) 204,-236.53 204,-288.53 214.61,-299.14 224.12,-299.14 237.56,-312.57 237.56,-333.56 255,-351 255,-426 271,-442 272.77,-443.77 276.91,-443.77 282.41,-438.26 284.54,-438.26 289.49,-443.21 289.49,-445.33 275.83,-458.99 275.83,-461.11 280.78,-466.06 282.91,-466.06 293.41,-455.55 295.54,-455.55 300.49,-460.5 300.49,-462.62 298.12,-464.98 298.12,-469.12 306.23,-477.23 308,-479 334,-505 334,-769 v1(344,-779)
DDR3_D21: U1.U4 U3.H8 | length 727.4
  Top w4.2: U1.U4@204.48,-205.51 v1(220.23,-221.26) ; U3.H8@394.99,-795.47 v1(410.74,-779.72)
  Layer 2 w5: v1(220.23,-221.26) 236.97,-238 260,-238 267,-245 267,-264 272,-269 288.47,-269 300,-280.53 300,-286 300.22,-286.22 300.22,-290.26 309.96,-300 325.07,-300 331,-305.93 331,-411 427,-507 427,-763.46 v1(410.74,-779.72)
DDR3_D22: U1.U2 U3.F7 | length 727.5
  Top w4.2: U1.U2@204.48,-268.5 204.99,-268.5 219.49,-283 v1(220,-283) ; v1(348.5,-719) 349.26,-719 362.74,-732.48 U3.F7@363.5,-732.48
  Layer 2 w5: v1(220,-283) 220.71,-283 238.96,-301.24 258.29,-301.24 266.79,-309.74 266.79,-407.79 280,-421 281.77,-422.77 285.91,-422.77 288.71,-419.97 292.24,-419.97 295.78,-423.51 295.78,-427.04 292.68,-430.14 292.68,-433.68 296.21,-437.21 299.75,-437.21 302.85,-434.11 306.39,-434.11 309.92,-437.65 309.92,-441.18 303.68,-447.43 303.68,-450.96 307.21,-454.5 310.75,-454.5 316.99,-448.26 320.53,-448.26 324.06,-451.79 324.06,-455.33 312.33,-467.06 312.33,-470.6 315.86,-474.13 319.4,-474.13 331.13,-462.4 334.67,-462.4 338.2,-465.93 338.2,-469.47 326.47,-481.2 326.47,-484.74 330,-488.28 333.54,-488.28 345.28,-476.54 348.81,-476.54 352.35,-480.07 352.35,-483.61 340.61,-495.35 340.61,-498.88 344.15,-502.42 347.68,-502.42 359.13,-490.96 362.67,-490.96 366.21,-494.5 366.21,-498.04 363.69,-500.55 363.69,-504.69 380,-521 380,-550 380,-569.49 364.75,-584.74 364.75,-701.25 348.5,-717.5 v1(348.5,-719)
DDR3_D23: U1.U3 U3.F8 | length 728.6
  Top w4.2: U1.U3@204.48,-237.01 v1(220.23,-252.76) ; v1(381.49,-715.55) 381.49,-717.26 394.99,-730.77 U3.F8@394.99,-732.48
  Layer 2 w5: v1(220.23,-252.76) 236.47,-269 258.51,-269 268.39,-278.89 268.39,-289.93 278.28,-299.82 287.82,-299.82 299,-311 299,-414 306,-421 307.77,-422.77 311.91,-422.77 319.91,-414.76 322.04,-414.76 326.99,-419.71 326.99,-421.83 317.97,-430.85 317.97,-432.97 322.92,-437.92 325.04,-437.92 334.06,-428.91 336.18,-428.91 341.13,-433.86 341.13,-435.98 332.11,-444.99 332.11,-447.11 337.06,-452.06 339.18,-452.06 348.2,-443.05 350.32,-443.05 355.27,-448 355.27,-450.12 346.26,-459.13 346.26,-461.26 351.2,-466.2 353.33,-466.2 362.34,-457.19 364.46,-457.19 369.41,-462.14 369.41,-464.26 360.4,-473.28 360.4,-475.4 365.35,-480.35 367.47,-480.35 371.34,-476.47 373.46,-476.47 378.41,-481.42 378.41,-483.54 375.55,-486.41 375.55,-490.55 396,-511 396,-524 396,-701.04 v1(381.49,-715.55)
DDR3_D24: U1.V1 U3.A3 | length 576.9
  Top w4.2: v1(221.77,-559.25) U3.A3@237.51,-575 ; U1.V1@235.98,-300 236.26,-300 252,-315.74 v1(252.29,-315.74)
  Layer 1 w5: v1(221.77,-559.25) 209,-546.48 209,-501 209,-498.5 206.07,-495.57 202.5,-495.57 201,-494.07 201,-487.07 202.5,-485.57 222.5,-485.57 224,-484.07 224,-477.07 222.5,-475.57 202.5,-475.57 201,-474.07 201,-467.07 202.5,-465.57 222.5,-465.57 224,-464.07 224,-457.07 222.5,-455.57 202.5,-455.57 201,-454.07 201,-447.07 202.5,-445.57 222.5,-445.57 224,-444.07 224,-437.07 222.5,-435.57 202.5,-435.57 201,-434.07 201,-427.07 202.5,-425.57 222.5,-425.57 224,-424.07 224,-417.07 222.5,-415.57 203.27,-415.57 201.77,-414.07 201.77,-407.07 203.27,-405.57 206.07,-405.57 209,-402.64 209,-395 209,-381 209.5,-380.5 211.27,-378.73 211.27,-374.59 203.79,-367.11 203.79,-364.99 208.74,-360.04 210.86,-360.04 229.96,-379.14 232.08,-379.14 237.03,-374.19 237.03,-372.06 226.29,-361.33 226.29,-359.21 231.24,-354.26 233.37,-354.26 244.1,-364.99 246.22,-364.99 251.17,-360.04 251.17,-357.92 243.69,-350.45 243.69,-346.31 245.5,-344.5 252.29,-337.71 v1(252.29,-315.74)
DDR3_D25: U1.Y3 U3.C8 | length 577.2
  Top w4.2: U1.Y3@298.97,-237.01 299.96,-238 394,-238 v1(395,-239) ; U3.C8@394.99,-637.99 v1(410.74,-622.24)
  Layer 1 w5: v1(395,-239) 425.24,-269.24 425.24,-288 425.24,-290.5 428.17,-293.43 443.74,-293.43 445.24,-294.93 445.24,-301.93 443.74,-303.43 415.12,-303.43 413.62,-304.93 413.62,-311.93 415.12,-313.43 422.31,-313.43 425.24,-316.36 425.24,-330 425.24,-607.74 v1(410.74,-622.24)
DDR3_D26: U1.W1 U3.C3 | length 577.2
  Top w4.2: v1(221.77,-622.24) U3.C3@237.51,-637.99 ; U1.W1@267.47,-300 v1(283.22,-315.75)
  Layer 1 w5: v1(221.77,-622.24) 242.76,-622.24 283.22,-581.78 283.22,-489 283.22,-486.5 280.29,-483.57 277.5,-483.57 276,-482.07 276,-475.07 277.5,-473.57 289.34,-473.57 290.84,-472.07 290.84,-465.07 289.34,-463.57 277.5,-463.57 276,-462.07 276,-455.07 277.5,-453.57 289.34,-453.57 290.84,-452.07 290.84,-445.07 289.34,-443.57 277.5,-443.57 276,-442.07 276,-435.07 277.5,-433.57 289.34,-433.57 290.84,-432.07 290.84,-425.07 289.34,-423.57 277.5,-423.57 276,-422.07 276,-415.07 277.5,-413.57 289.34,-413.57 290.84,-412.07 290.84,-405.07 289.34,-403.57 277.5,-403.57 276,-402.07 276,-395.07 277.5,-393.57 296.72,-393.57 298.22,-392.07 298.22,-385.07 296.72,-383.57 277.5,-383.57 276,-382.07 276,-375.07 277.5,-373.57 295.83,-373.57 297.33,-372.07 297.33,-365.07 295.83,-363.57 280.29,-363.57 278.79,-362.07 278.79,-355.07 280.29,-353.57 283.22,-350.64 283.22,-336 v1(283.22,-315.75)
DDR3_D27: U1.Y4 U3.A7 | length 576.9
  Top w4.2: U1.Y4@298.97,-205.51 v1(314.72,-221.26) ; U3.A7@363.5,-575 363.75,-574.75 363.75,-555.25 v1(364,-555)
  Layer 1 w5: v1(314.72,-221.26) 364,-270.54 364,-273.04 366.93,-275.97 371.9,-275.97 374.4,-278.47 374.4,-283.47 371.9,-285.97 358.5,-285.97 356,-288.47 356,-293.47 358.5,-295.97 374.74,-295.97 377.24,-298.47 377.24,-303.47 374.74,-305.97 358.5,-305.97 356,-308.47 356,-313.47 358.5,-315.97 374.74,-315.97 377.24,-318.47 377.24,-323.47 374.74,-325.97 358.5,-325.97 356,-328.47 356,-333.47 358.5,-335.97 374.74,-335.97 377.24,-338.47 377.24,-343.47 374.74,-345.97 358.5,-345.97 356,-348.47 356,-353.47 358.5,-355.97 374.74,-355.97 377.24,-358.47 377.24,-363.47 374.74,-365.97 359.31,-365.97 356.81,-368.47 356.81,-373.47 359.31,-375.97 366.93,-375.97 369.43,-378.47 369.43,-383.47 366.93,-385.97 364,-388.9 364,-405 v1(364,-555)
DDR3_D28: U1.Y2 U3.D7 | length 577.1
  Top w4.2: U1.Y2@298.97,-268.5 v1(314.72,-284.25) ; U3.D7@363.5,-669.49 v1(379.25,-653.74)
  Layer 1 w5: v1(314.72,-284.25) 332,-301.54 332,-312 332,-314.5 334.93,-317.43 336.5,-317.43 338,-318.93 338,-325.93 336.5,-327.43 325.22,-327.43 323.72,-328.93 323.72,-335.93 325.22,-337.43 336.5,-337.43 338,-338.93 338,-345.93 336.5,-347.43 325.22,-347.43 323.72,-348.93 323.72,-355.93 325.22,-357.43 336.5,-357.43 338,-358.93 338,-365.93 336.5,-367.43 325.22,-367.43 323.72,-368.93 323.72,-375.93 325.22,-377.43 330.5,-377.43 332,-378.93 332,-385.93 330.5,-387.43 325.22,-387.43 323.72,-388.93 323.72,-395.93 325.22,-397.43 334.85,-397.43 336.35,-398.93 336.35,-405.93 334.85,-407.43 325.22,-407.43 323.72,-408.93 323.72,-415.93 325.22,-417.43 336.5,-417.43 338,-418.93 338,-425.93 336.5,-427.43 328.54,-427.43 327.04,-428.93 327.04,-435.93 328.54,-437.43 329.07,-437.43 332,-440.36 332,-446.27 332,-626 359.74,-653.74 v1(379.25,-653.74)
DDR3_D29: U1.W3 U3.B8 | length 577.1
  Top w4.2: U1.W3@267.47,-237.01 v1(283.22,-252.76) ; U3.B8@394.99,-606.49 v1(410.74,-590.75)
  Layer 1 w5: v1(283.22,-252.76) 300.22,-269.75 331.75,-269.75 347,-285 347,-365.43 347,-377.93 344.07,-380.86 342.5,-380.86 341,-382.36 341,-389.36 342.5,-390.86 351.8,-390.86 353.3,-392.36 353.3,-399.36 351.8,-400.86 349.93,-400.86 347,-403.79 347,-415 347,-620 365,-638 383.99,-638 394.36,-627.63 394.36,-618.11 410.28,-602.2 410.28,-591.21 v1(410.74,-590.75)
DDR3_D30: U1.V2 U3.A2 | length 577.1
  Top w4.2: v1(190.27,-559.25) U3.A2@206.02,-575 ; U1.V2@235.98,-268.5 236.74,-268.5 252.24,-284 v1(253,-284)
  Layer 1 w5: v1(190.27,-559.25) 192,-557.52 192,-513 192,-494 192,-491.5 189.07,-488.57 173.5,-488.57 172,-487.07 172,-480.07 173.5,-478.57 190.5,-478.57 192,-477.07 192,-470.07 190.5,-468.57 173.5,-468.57 172,-467.07 172,-460.07 173.5,-458.57 190.5,-458.57 192,-457.07 192,-450.07 190.5,-448.57 173.5,-448.57 172,-447.07 172,-440.07 173.5,-438.57 190.5,-438.57 192,-437.07 192,-430.07 190.5,-428.57 173.5,-428.57 172,-427.07 172,-420.07 173.5,-418.57 191.27,-418.57 192.77,-417.07 192.77,-410.07 191.27,-408.57 173.5,-408.57 172,-407.07 172,-400.07 173.5,-398.57 196.12,-398.57 197.62,-397.07 197.62,-390.07 196.12,-388.57 182.83,-388.57 181.33,-387.07 181.33,-380.07 182.83,-378.57 189.07,-378.57 192,-375.64 192,-369 192,-351 192,-313 205.32,-299.68 236.3,-299.68 251.98,-284 v1(253,-284)
DDR3_D31: U1.V3 U3.C2 | length 577.8
  Top w4.2: v1(190.27,-622.24) U3.C2@206.02,-637.99 ; U1.V3@235.98,-237.01 v1(251.72,-252.76)
  Layer 1 w5: v1(190.27,-622.24) 191.97,-620.54 191.97,-612.03 197,-607 234,-607 267,-574 267,-564 267,-561.5 264.07,-558.57 253.5,-558.57 252,-557.07 252,-550.07 253.5,-548.57 272.72,-548.57 274.22,-547.07 274.22,-540.07 272.72,-538.57 253.5,-538.57 252,-537.07 252,-530.07 253.5,-528.57 272.72,-528.57 274.22,-527.07 274.22,-520.07 272.72,-518.57 255.03,-518.57 253.53,-517.07 253.53,-510.07 255.03,-508.57 264.07,-508.57 267,-505.64 267,-344 267.5,-343.5 267.5,-268.53 v1(251.72,-252.76)
DDR3_DM0: U1.A1 U2.E7 | length 741.2
  Top w4.2: U1.A1@-299.46,-300 -299.46,-323.27 -279.73,-343 -252,-343 v1(-251,-342) ; v1(-272,-689) -272,-689.77 -260.79,-700.98 U2.E7@-238,-700.98
  Layer 1 w5: v1(-272,-689) -270.54,-687.54 -270.54,-678.54 -254,-662 -254,-507 -254,-504.5 -256.93,-501.57 -258.5,-501.57 -260,-500.07 -260,-493.07 -258.5,-491.57 -231,-491.57 -229.5,-490.07 -229.5,-483.07 -231,-481.57 -255.88,-481.57 -257.38,-480.07 -257.38,-473.07 -255.88,-471.57 -231,-471.57 -229.5,-470.07 -229.5,-463.07 -231,-461.57 -253.36,-461.57 -254.86,-460.07 -254.86,-453.07 -253.36,-451.57 -231,-451.57 -229.5,-450.07 -229.5,-443.07 -231,-441.57 -243.56,-441.57 -245.06,-440.07 -245.06,-433.07 -243.56,-431.57 -231,-431.57 -229.5,-430.07 -229.5,-423.07 -231,-421.57 -243,-421.57 -244.5,-420.07 -244.5,-413.07 -243,-411.57 -231,-411.57 -229.5,-410.07 -229.5,-403.07 -231,-401.57 -256.5,-401.57 -258,-400.07 -258,-393.07 -256.5,-391.57 -231,-391.57 -229.5,-390.07 -229.5,-383.07 -231,-381.57 -244.92,-381.57 -246.42,-380.07 -246.42,-373.07 -244.92,-371.57 -239.93,-371.57 -237,-368.64 -237,-364 -237,-356 v1(-251,-342)
DDR3_DM1: U1.F1 U2.D3 | length 619.3
  Top w4.2: v1(-380.6,-652.87) -379.95,-653.52 -379.95,-664.05 -375.06,-668.94 -364.53,-668.94 U2.D3@-363.98,-669.49 ; v1(-157.72,-315.75) U1.F1@-141.98,-300
  Layer 2 w5: v1(-380.6,-652.87) -355,-627.27 -355,-537.95 -335.16,-518.11 -326.32,-509.27 -322.18,-509.27 -318.42,-513.03 -316.3,-513.03 -311.35,-508.08 -311.35,-505.96 -315.11,-502.2 -315.11,-498.06 -260.03,-442.97 -244.5,-427.45 -244.5,-425.5 -244.5,-417.82 -241.57,-414.89 -237.43,-414.89 -235.75,-416.57 -233.63,-416.57 -228.68,-411.62 -228.68,-409.5 -232.86,-405.32 -232.86,-403.2 -227.91,-398.25 -225.79,-398.25 -221.61,-402.43 -219.48,-402.43 -214.53,-397.48 -214.53,-395.36 -218.71,-391.18 -218.71,-389.06 -213.76,-384.11 -211.64,-384.11 -207.46,-388.29 -205.34,-388.29 -200.39,-383.34 -200.39,-381.22 -204.61,-377 -204.61,-374.88 -199.66,-369.93 -197.54,-369.93 -193.32,-374.15 -191.2,-374.15 -186.25,-369.2 -186.25,-367.08 -199.24,-354.09 -199.24,-351.97 -194.29,-347.02 -192.17,-347.02 -179.18,-360 -177.06,-360 -172.11,-355.06 -172.11,-352.93 -188.08,-336.96 -188.08,-334.84 -183.13,-329.89 -181.01,-329.89 -172.28,-338.62 -168.14,-338.62 -163.76,-334.24 -157.72,-328.21 v1(-157.72,-315.75)
DDR3_DM2: U1.T1 U3.E7 | length 727.8
  Top w4.2: U1.T1@172.98,-300 174.54,-301.56 174.54,-311.48 205.6,-342.54 221.54,-342.54 v1(222,-343) ; v1(310,-679) 331.98,-700.98 U3.E7@363.5,-700.98
  Layer 2 w5: v1(222,-343) 239.5,-360.5 239.5,-437.5 280,-478 302.5,-500.5 315.27,-500.5 316.77,-502 316.77,-509 315.27,-510.5 300.5,-510.5 299,-512 299,-519 300.5,-520.5 323.5,-520.5 325,-522 325,-529 323.5,-530.5 300.5,-530.5 299,-532 299,-539 300.5,-540.5 323.5,-540.5 325,-542 325,-549 323.5,-550.5 306.94,-550.5 305.44,-552 305.44,-559 306.94,-560.5 323.5,-560.5 325,-562 325,-569 323.5,-570.5 311.5,-570.5 310,-572 310,-579 311.5,-580.5 323.5,-580.5 325,-582 325,-589 323.5,-590.5 308.51,-590.5 307.01,-592 307.01,-599 308.51,-600.5 323.5,-600.5 325,-602 325,-609 323.5,-610.5 311.5,-610.5 310,-612 310,-619 311.5,-620.5 317.32,-620.5 318.82,-622 318.82,-629 317.32,-630.5 312.93,-630.5 310,-633.43 310,-651 v1(310,-679)
DDR3_DM3: U1.Y1 U3.D3 | length 576.8
  Top w4.2: v1(221.77,-653.74) U3.D3@237.51,-669.49 ; U1.Y1@298.97,-300 v1(314.72,-315.75)
  Layer 1 w5: v1(221.77,-653.74) 233.5,-642 252,-642 314.72,-579.28 314.72,-540.57 314.72,-538.07 311.79,-535.14 296.22,-535.14 294.72,-533.64 294.72,-526.64 296.22,-525.14 321.5,-525.14 323,-523.64 323,-516.64 321.5,-515.14 296.22,-515.14 294.72,-513.64 294.72,-506.64 296.22,-505.14 321.5,-505.14 323,-503.64 323,-496.64 321.5,-495.14 297.74,-495.14 296.24,-493.64 296.24,-486.64 297.74,-485.14 317.65,-485.14 319.15,-483.64 319.15,-476.64 317.65,-475.14 314.72,-472.21 314.72,-367 314.72,-344 v1(314.72,-315.75)
DDR3_DQS0_N: U1.B2 U2.G3 | length 739.2
  Top w4: v1(-379.73,-748.23) U2.G3@-363.98,-763.97 ; v1(-283.71,-284.25) U1.B2@-267.96,-268.5
  Layer 1 w4: v1(-379.73,-748.23) -382.03,-745.93 -382.03,-734.23 -393.73,-722.53 -393.73,-710.93 -382.04,-699.23 -373.93,-699.23 -313.7,-639 -307,-632.3 -307,-567.42 -307,-562.2 -309.34,-559.86 -320.71,-559.86 -328.5,-552.07 -328.5,-536.65 -320.71,-528.86 -301.85,-528.86 -300.5,-527.51 -300.5,-521.21 -301.85,-519.86 -320.71,-519.86 -328.5,-512.07 -328.5,-496.65 -320.71,-488.86 -301.85,-488.86 -300.5,-487.51 -300.5,-481.21 -301.85,-479.86 -320.71,-479.86 -328.5,-472.07 -328.5,-456.65 -320.71,-448.86 -301.85,-448.86 -300.5,-447.51 -300.5,-441.21 -301.85,-439.86 -320.71,-439.86 -328.5,-432.07 -328.5,-416.65 -320.71,-408.86 -309.34,-408.86 -307,-406.52 -307,-393 -307,-364.1 -288.56,-345.65 -288.56,-330.7 -297.71,-321.55 -297.71,-298.25 v1(-283.71,-284.25)
DDR3_DQS0_P: U1.C2 U2.F3 | length 738.6
  Top w4: v1(-379.73,-716.73) U2.F3@-363.98,-732.48 ; v1(-252.21,-284.25) U1.C2@-236.46,-268.5
  Layer 1 w4: v1(-379.73,-716.73) -377.89,-716.73 -371.39,-710.23 -369.38,-710.23 -351.57,-692.43 -343.79,-684.65 -340.48,-684.65 -337.53,-687.6 -335.62,-687.6 -331.17,-683.14 -331.17,-681.24 -336.94,-675.46 -336.94,-673.55 -332.48,-669.1 -330.57,-669.1 -324.8,-674.87 -322.89,-674.87 -318.44,-670.42 -318.44,-668.51 -323.97,-662.98 -323.97,-661.07 -319.51,-656.61 -317.6,-656.61 -315.02,-659.19 -313.11,-659.19 -308.66,-654.74 -308.66,-652.83 -308.66,-649.52 -298.14,-639 -296,-636.86 -296,-567.42 -296,-557.65 -304.79,-548.86 -316.15,-548.86 -317.5,-547.51 -317.5,-541.21 -316.15,-539.86 -297.29,-539.86 -289.5,-532.07 -289.5,-516.65 -297.29,-508.86 -316.15,-508.86 -317.5,-507.51 -317.5,-501.21 -316.15,-499.86 -297.29,-499.86 -289.5,-492.07 -289.5,-476.65 -297.29,-468.86 -316.15,-468.86 -317.5,-467.51 -317.5,-461.21 -316.15,-459.86 -297.29,-459.86 -289.5,-452.07 -289.5,-436.65 -297.29,-428.86 -316.15,-428.86 -317.5,-427.51 -317.5,-421.21 -316.15,-419.86 -304.79,-419.86 -296,-411.07 -296,-393 -296,-368.65 -277.56,-350.21 -277.56,-329.4 -266.21,-318.05 -266.21,-298.25 v1(-252.21,-284.25)